# Altium PCB DC-DC_Conv_MCU.PcbDoc (part 2 of 2)
Units mm, origin at the board's own origin, x right, y up, seen from the top; angles counter-clockwise.
Board outline 149.01 x 76.01 mm, 2 copper layers (Top Layer, Bottom Layer); 299 components, 168 nets, 857 pads, 0 vias.
Unrouted connection lines stored in the file: 625.
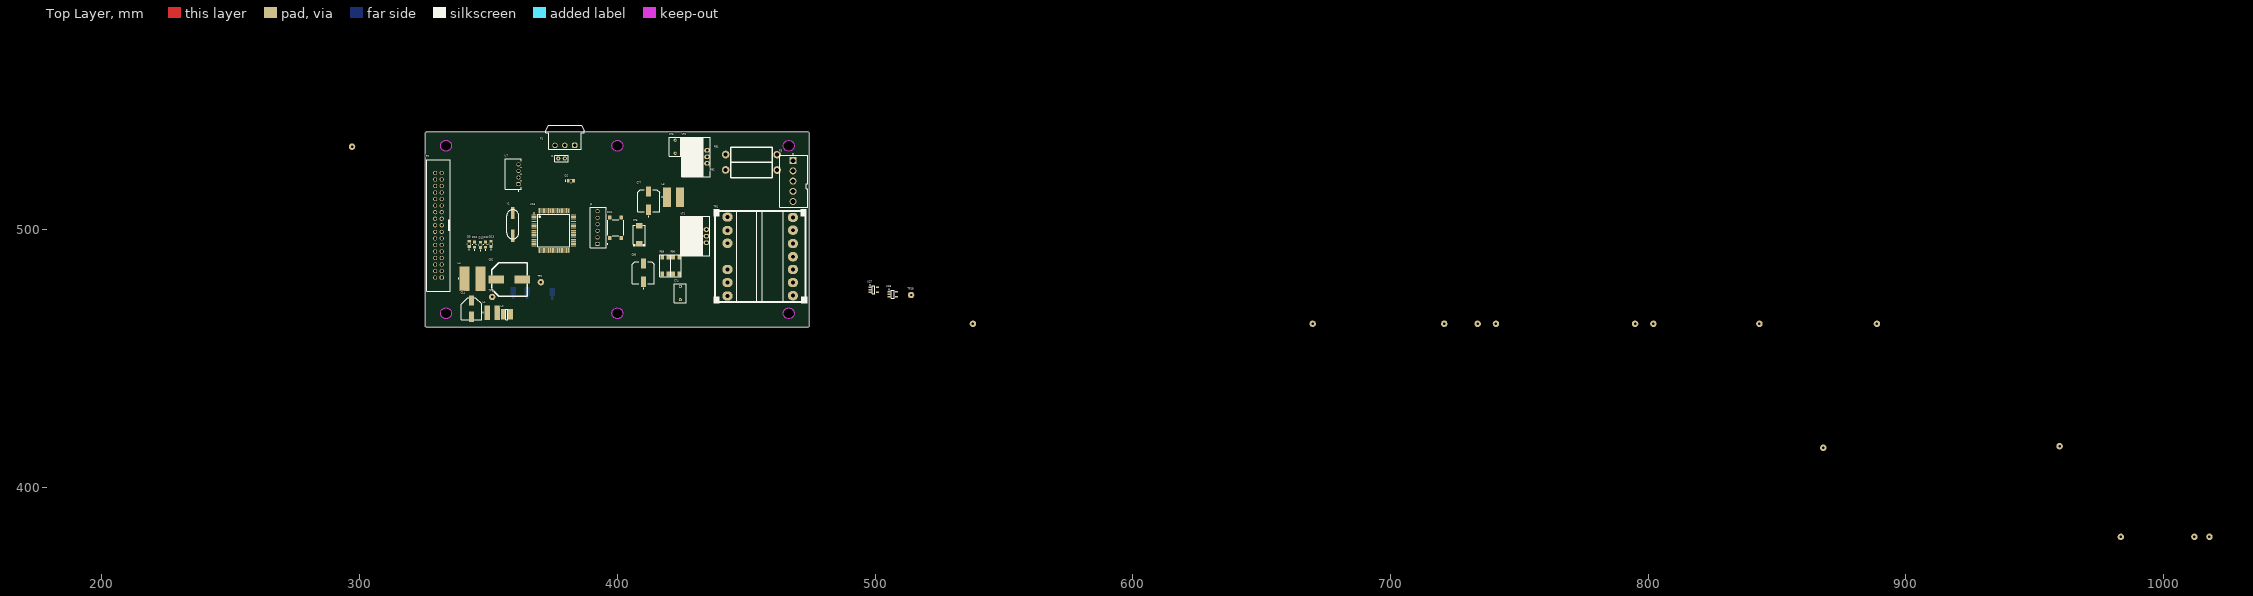
[diagram p0: Top Layer view]

## Silkscreen, mask and mechanical layers (free items; w line width, h text height) (continued)
Mechanical 1: (continued)
  circle w0.013: c333.5,532.5 r2.1
  circle w0.013: c466.5,532.5 r2.1
  circle w0.013: c400,532.5 r2.1
  circle w0.013: c466.5,467.5 r2.6
  circle w0.013: c466.5,532.5 r2.6
  circle w0.013: c333.5,467.5 r2.6
  circle w0.013: c333.5,532.5 r2.6
  circle w0.013: c400,467.5 r2.6
  circle w0.013: c400,532.5 r2.6
  lines w0.013: 360,462.5 325.5,462.5 ; 360,465.175 ccw(c363.5,500) 367,465.175 ; 325.5,462.5 326,462 474,462 474.5,462.5 474.5,537.5 474,538 326,538 325.5,537.5 325.5,462.5